# Altium PCB Kame_FMU.PcbDoc (part 2 of 2)
Units mm, origin at the board's own origin, x right, y up, seen from the top; angles counter-clockwise.
Board outline 31 x 31 mm, 6 copper layers (Top, GND2, L3, L4, GND5, Bottom), stack 1.578 mm thick; 102 components, 158 nets, 567 pads, 386 vias.
Unrouted connection lines stored in the file: 87.
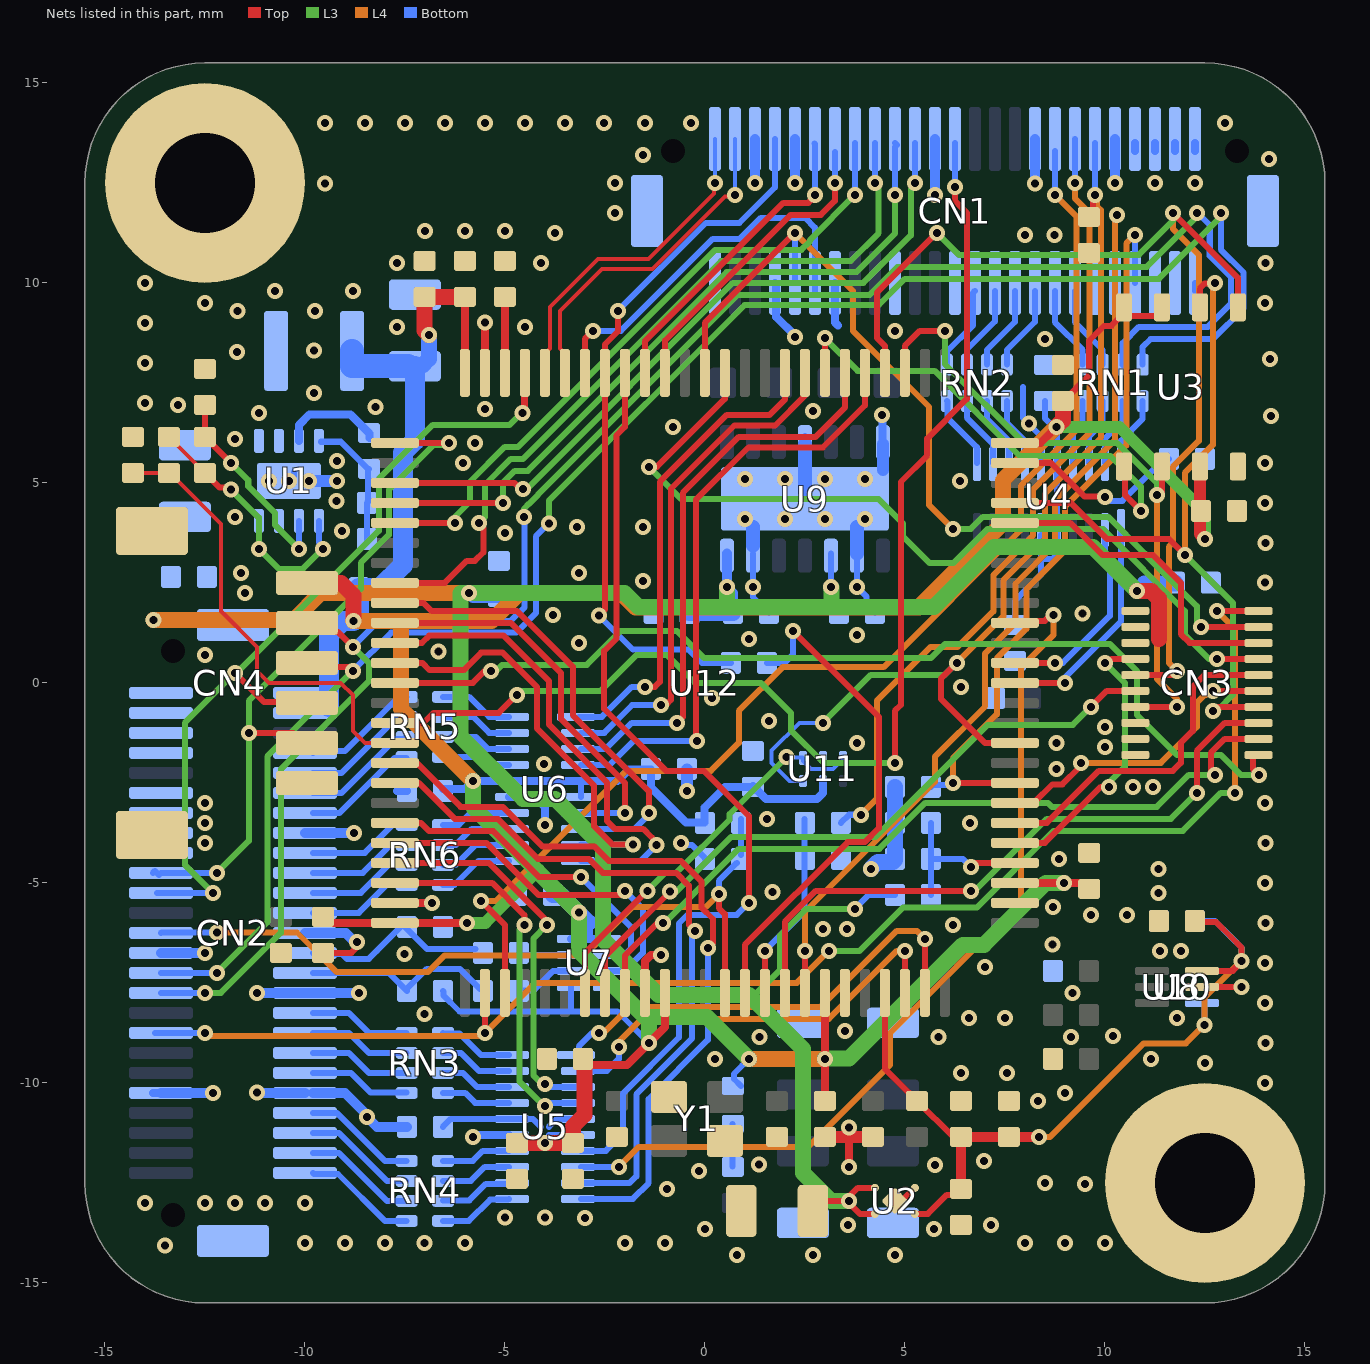
[diagram p6: the nets of this part, all layers, seen from the top]

## Via types
v1: diameter 0.4, hole 0.2, Top to Bottom, tented both sides, 375 vias
v2: diameter 0.4, hole 0.2, Top to Bottom, 11 vias

## Nets (pads, with @x,y where several pads share a name; then routed paths per layer and width w, separated by ;. In a path a pad name is that pad's centre, name@x,y a point inside that pad or via, vN(x,y) a via of type N, cw(c..) or ccw(c..) an arc to the next point about the centre after c; other vN are vias at no path point) (continued)
GND: C1.1 C2.1 C3.2 C4.1 C6.2 C7.2 C8.1 C9.1 C10.1 C11.1 C12.1 C13.1 C14.1 C15.2 C16.1 C17.1 C18.1 C19.1 C20.1 C21.1 C22.1 C23.1 C24.1 C25.1 C26.1 C27.1 C28.2 C29.2 C30.2 C31.2 C32.2 C33.2 C34.2 C35.2 C36.1 C37.2 C38.1 C39.1 C40.2 C41.2 C42.2 C43.2 C44.1 CN1.1 CN1.2 CN1.3 CN1.4 CN1.5 CN1.6 CN1.7 CN1.9 CN1.12 CN1.17 CN1.26 CN1.27 CN1.32 CN1.38 CN1.41 CN1.44 CN1.45 CN1.50 CN1.MP1 CN1.MP2 CN2.11 CN2.13 CN2.15 CN2.16 CN2.17 CN2.26 CN2.27 CN2.32 CN2.41 CN2.42 CN2.MP1 CN2.MP2 CN3.15 CN3.17 CN3.19 CN4.6 CN4.MP1 CN4.MP2 PTH1.1 PTH2.1 R3.1 R10.1 R15.1 R17.2 R22.1 R25.1 R27.1 R28.1 R29.1 R30.2 RJ1.2 U1.1 U1.9 U2.2 U2.5 U3.4 U4.15 U5.15 U6.15 U7.4 U8.5 U9.2 U9.6 U9.11 U9.14 U9.15 U10.5 U11.2 U12.10 U12.20 U12.27 U12.74 U12.99 Y1.2 Y1.4 | length 48.7
  Top w0.15: C30.2@-9.55,-6.75 -8.837,-6.75 -8.6,-6.513 v1@-8.6,-6.475 ; U12.10@-1.5,-7.75 U12.10@-1.5,-7.275 ; Y1.4@-0.9,-10.35 Y1.4@-0.616,-10.634 ; Y1.2@0.125,-11.125 0.45,-11.45 Y1.2@0.5,-11.45 ; U2.5@4.75,-12.95 4.925,-12.95 U2.2@5.25,-12.625 ; U8.5@12.485,-7.6 v1(13.41,-7.6)
  Top w0.2: U12.99@-7.75,-5.5 v1(-6.824,-5.5) ; U12.74@-5.5,7.75 -5.497,7.753 -5.497,9.013 v1(-5.494,9.016) ; U12.10@-1.5,-7.75 -1.5,-6.95 -1.35,-6.8 v1(-1.1,-6.8) ; v1(3.6,-12.1) 3.6,-11.35 v1(3.6,-11.11)
  Top w0.3: C33.2@3,-11.35 3.6,-11.35 C36.1@4.2,-11.35
  Bottom w0.15: v2(-10.4,5.05) -10.276,5.174 U1.9@-10.276,5.274 ; U1.9@-9.887,5.05 -9.875,5.062 U1.9@-9.875,5.176 ; v1(-0.6,-4) -0.552,-4.048 -0.327,-4.048 0,-4.375 C44.1@0,-4.4 ; U9.6@1.2,3.23 U9.6@1.2,3.18 v1@1.2,2.432 ; C20.1@1.6,1.75 1.201,2.149 v1@1.201,2.431 ; U9.11@2.5,5.97 U9.11@2.5,6.17 ; v1(3.8,2.4) 4.034,2.166 4.034,1.966 C19.1@4.25,1.75 ; v1@3.8,2.469 U9.2@3.8,3.23 ; 7.95,7.4 7.95,6.622 8.4,6.172 U4.15@8.4,5.5 ; CN1.2@12.25,9.8 CN1.2@12.25,10 ; U10.5@12.485,-7.6 v1(13.41,-7.6) ; v1@1.2,2.432 v1@1.201,2.431 ; v1@1.2,2.432 1.2,2.41 1.201,2.409 v1@1.201,2.431
  Bottom w0.2: CN2.41@-13.8,-10.25 CN2.41@-13.6,-10.25 ; v1(-8.775,-3.75) -8.75,-3.75 v1@-8.746,-3.746 ; v1@-8.754,-6.475 v1(-8.7,-6.475) ; v1@-8.654,-6.475 v1@-8.6,-6.475 ; C14.1@-7.7,-2.7 C14.1@-7.45,-2.7 ; v1(-5.8,-11.355) -5.746,-11.355 -5.691,-11.3 U5.15@-4.9,-11.3 ; U6.15@-4.9,-2.85 -4.259,-2.85 -4,-3.109 v1@-4,-3.45 ; CN1.44@1.75,10 1.78,9.97 1.78,9.152 2.25,8.682 v1(2.25,8.65) ; CN1.38@3.25,10 3.25,9.014 3.325,8.939 ; v1(4.433,6.7) 4.441,6.691 4.441,5.979 U9.14@4.45,5.97 ; CN1.9@10.25,13.3 CN1.9@10.25,13.5 ; CN1.7@10.75,13.3 CN1.7@10.75,13.5 ; CN1.5@11.25,13.3 CN1.5@11.25,13.5 ; CN1.3@11.75,13.3 CN1.3@11.75,13.5 ; CN1.1@12.25,13.3 CN1.1@12.25,13.5
  Bottom w0.25: CN2.41@-13.6,-10.25 v1(-12.3,-10.25) ; CN2.27@-13.6,-6.75 v1(-12.5,-6.75) ; v1(-11.2,-10.245) -11.197,-10.247 -10.003,-10.247 CN2.42@-10,-10.25 ; v1(-11.2,-7.75) CN2.32@-10,-7.75 v1(-8.654,-7.75) ; CN2.26@-10,-6.25 -8.979,-6.25 v1@-8.754,-6.475 ; CN2.16@-10,-3.75 v1(-8.775,-3.75) ; CN2.42@-9.8,-10.25 -9,-10.25 -8.45,-10.8 v1(-8.45,-10.85) -8.2,-11.1 C13.1@-7.45,-11.1 ; v1(1.25,12.5) CN1.45@1.25,13.6 ; v1(2.25,12.5) CN1.41@2.25,13.6 ; v1(5.75,12.2) CN1.27@5.75,13.6 ; v1(8.25,12.482) CN1.17@8.25,13.6 ; v1(10.25,12.5) CN1.9@10.25,13.6
  Bottom w0.3: U1.9@-9.887,5.05 v1(-9.2,5.05) ; v1@-0.467,-2.667 -0.463,-2.667 -0.45,-2.654 C15.2@-0.45,-2.167 ; U9.15@4.45,5.32 U9.14@4.45,5.97
  Bottom w0.35: U9.6@1.2,3.43 U9.15@1.2,3.899 ; U9.15@2.5,4.8 U9.11@2.5,5.97 ; U9.2@3.8,3.23 U9.15@3.8,3.9
  Bottom w0.4: v1(4.15,-4.65) 4.325,-4.475 4.7,-4.475 4.75,-4.425 R22.1@4.75,-4.4 C39.1@4.75,-3.5 R30.2@4.75,-2.6
  other v1: 0.8,-14.3 2.7,-14.3 4.75,-14.3 -13.5,-14.062 -10,-14 -9,-14 -8,-14 -7.006,-14 -6,-14 -2,-14 -1,-14 8,-14 9,-14 10,-14 0,-13.65 5.728,-13.65 3.576,-13.55 7.15,-13.55 -3,-13.375 -5,-13.363 -4,-13.363 -14,-13.005 -12.494,-13.005 -11.75,-13.005 -11,-13.005 -10,-13.005 -0.95,-12.65 9.5,-12.525 8.5,-12.5 -0.15,-12.2 1.347,-12.034 5.75,-12.05 6.976,-11.95 8.332,-10.45 9,-10.25 14,-10 6.4,-9.75 7.55,-9.75 12.5,-9.5 0.248,-9.4 11.15,-9.4 14.01,-9 1.36,-8.849 5.834,-8.849 9.15,-8.849 10.2,-8.828 3.5,-8.7 6.602,-8.379 7.5,-8.379 11.8,-8.379 -7.006,-8.275 14,-8 9.195,-7.75 7.002,-7.1 14,-7 -7.508,-6.779 11.375,-6.698 11.905,-6.7 8.695,-6.541 2.95,-6.15 3.55,-6.15 6.2,-6.049 14.01,-6 9.65,-5.8 10.55,-5.8 8.7,-5.6 11.338,-5.25 1.688,-5.232 14,-5 11.338,-4.65 8.85,-4.4 -12.5,-4 14.01,-4 -4,-3.55 -12.5,-3.5 6.633,-3.5 1.55,-3.4 -12.5,-3 14,-3 -0.45,-2.7 10.7,-2.6 11.2,-2.6 8.785,-2.156 -4.017,-2.028 10,-1.6 3.8,-1.5 8.785,-1.5 10,-1.1 1.6,-0.95 0.18,-0.383 6.4,-0.1 -12.494,0.7 -6.66,0.784 -3.15,1 1.1,1.095 3.8,1.2 -3.8,1.7 9.445,1.734 -11.5,2.25 1.2,2.4 14,2.505 -1.55,2.55 -11.6,2.75 -3.15,2.75 14.01,3.5 -5,3.742 -9.071,3.798 -3.2,3.9 -1.55,3.9 -11.75,4.15 14,4.5 -9.211,4.55 6.372,5.049 -6.05,5.502 14,5.5 -9.2,5.55 -5.748,6 -11.75,6.1 -0.8,6.4 8.107,6.488 14.15,6.677 -11.15,6.75 2.7,6.8 -5.501,6.85 -8.238,6.897 -13.176,6.95 -14,7 -9.773,7.25 -14,8 14.133,8.1 -11.7,8.268 -9.773,8.305 8.5,8.6 4.75,8.8 -7.7,8.9 -4.5,8.9 -14,9 -11.683,9.3 -9.746,9.3 -12.5,9.5 14,9.5 -10.75,9.8 -8.8,9.8 -14,10 -7.7,10.5 -4.1,10.5 14.01,10.5 8,11.2 8.744,11.2 -3.746,11.25 -7,11.3 -6,11.3 -5,11.3 -2.25,11.75 -9.5,12.482 -2.25,12.5 11.25,12.5 12.25,12.5 14.1,13.1 -1.55,13.2 -9.5,14 -8.5,14 -7.5,14 -6.5,14 -5.494,14 -4.5,14 -3.5,14 -2.517,14 -1.5,14 -0.35,14 13,14
  other v2: 1,4.1 2,4.1 3,4.1 4,4.1 -10.9,5.05 -9.9,5.05 1,5.1 2,5.1 3,5.1 4,5.1
GPIO1: CN1.25 U12.90 | length 31
  Top w0.15: U12.90@-7.75,-1 -7.034,-1 -6.784,-0.75 -5.15,-0.75 v1(-4.7,-0.3) ; v1(4.75,-2) 4.75,-0.7 4.898,-0.552 4.898,5.024 5.556,5.681 5.556,6.106 6.55,7.1 6.55,11.75 6.25,12.05
  Top w0.152: 6.25,12.05 v1(6.25,12.4)
  L3 w0.15: v1(-4.7,-0.3) -4.6,-0.2 -2.6,-0.2 -1.7,0.7 -0.95,0.7 -0.25,0 1.4,0 2.15,-0.75 2.15,-1.184 2.966,-2 v1(4.75,-2)
  Bottom w0.15: v1(4.75,-2) v1@4.8,-1.95
  Bottom w0.152: v1(6.25,12.4) 6.25,12.5 CN1.25@6.25,13.5
GPIO2: CN1.40 U12.69 | length 9.5
  Top w0.15: U12.69@-3,7.75 -3,8.6 v1(-2.8,8.8)
  Bottom w0.15: v1(-2.8,8.8) -2.104,8.8 0.196,11.1 0.876,11.1 1.401,11.625 2.505,11.625 2.75,11.38 CN1.40@2.75,10 CN1.40@2.75,9.8
I2C_SCL: U7.2 U12.95 | length 8.2
  Top w0.15: U12.95@-7.75,-3.5 -7.1,-3.5 -6.9,-3.7 -5.3,-3.7 -4.15,-4.85 v1(-3.1,-4.85)
  Bottom w0.15: v1(-3.1,-4.85) -1.85,-6.1 -1.85,-6.65 -2,-6.8 U7.2@-2.45,-6.8
I2C_SCL_MB: CN2.28 R5.2 R7.2 | length 4.8
  Bottom w0.15: CN2.28@-9.8,-6.75 -9.771,-6.779 -9.071,-6.779 -8.95,-6.9 -8.402,-6.9 -8.202,-6.7 -7.551,-6.049 R5.2@-7.45,-6.15 ; R5.2@-7.45,-6.1 R5.2@-7.45,-6.15 ; R7.2@-5.73,-6.65 -6.95,-6.65 R5.2@-7.45,-6.15
I2C_SDA: U7.3 U12.96 | length 9.2
  Top w0.15: U12.96@-7.75,-4 -5.463,-4 -4.163,-5.3 -2.1,-5.3 v1(-2,-5.2)
  Bottom w0.15: U7.3@-2.45,-7.2 -2,-7.2 -1.55,-6.75 -1.55,-5.65 v1(-2,-5.2)
I2C_SDA_MB: CN2.30 R6.1 R8.2 | length 4.9
  Bottom w0.15: CN2.30@-9.8,-7.25 -7.9,-7.25 -7.45,-7.7 -7.45,-7.65 -6.95,-7.15 -6.125,-7.15 -5.625,-7.65 R8.2@-5.555,-7.65
ICM_INT#: CN3.11 U12.8 | length 17.1
  Top w0.15: U12.8@-2.5,-7.75 -2.5,-6.842 v1(-0.874,-5.216) ; v1(9.65,-0.6) 10.05,-0.2 CN3.11@10.98,-0.2
  L3 w0.15: v1(-0.874,-5.216) -0.712,-5.216 0.654,-3.85 4.267,-3.85 7.067,-1.05 9.2,-1.05 v1(9.65,-0.6)
IMU_HEAT_CTL: CN1.42 CN3.4 U12.63 | length 23.7
  Top w0.15: U12.63@0,7.75 0,9 v1(2.25,11.25) ; v1@12.3,1.4 v1(12.4,1.4) CN3.4@13.62,1.4
  L3 w0.15: v1(6.2,3.85) 6.65,3.85 6.95,4.15 10.084,4.15 11,3.234 11,3.222 12.3,1.922 v1@12.3,1.4
  L4 w0.15: v1(2.25,11.25) 3.7,9.8 3.7,8.804 5.607,6.897 5.607,4.443 v1(6.2,3.85)
  Bottom w0.15: CN1.42@2.25,10 2.25,10.008 v1(2.25,11.25)
MB_ESC_M1: CN1.14 RN1.6 | length 2.1
  Bottom w0.15: CN1.14@9.25,9.8 9.25,9.018 9.945,8.323 RN1.6@9.945,7.955
MB_ESC_M2: CN1.16 RN1.5 | length 2.1
  Bottom w0.15: CN1.16@8.75,9.8 8.75,9.02 9.445,8.325 RN1.5@9.445,7.955
MB_ESC_M3: CN1.18 RN2.8 | length 2.1
  Bottom w0.15: RN2.8@7.55,7.955 7.55,8.322 8.25,9.022 CN1.18@8.25,9.8
MB_ESC_M4: CN1.20 RN2.7 | length 2.1
  Bottom w0.15: RN2.7@7.05,7.955 7.05,8.322 7.75,9.022 CN1.20@7.75,9.8
MB_ESC_M5: CN1.22 RN2.6 | length 2.1
  Bottom w0.15: RN2.6@6.55,7.955 6.55,8.336 7.25,9.036 CN1.22@7.25,9.8
MB_ESC_M6: CN1.24 RN2.5 | length 2.1
  Bottom w0.15: RN2.5@6.05,7.955 6.05,8.285 6.696,8.931 6.696,9.746 CN1.24@6.75,9.8
MPU_INT#: CN3.8 U12.62 | length 21.5
  Top w0.15: v1(-1.4,5.4) -1.4,5.3 -1.3,5.4 -1.2,5.4 0.5,7.1 U12.62@0.5,7.6 ; v1(12.8,0.6) CN3.8@13.62,0.6
  L3 w0.15: v1(-1.4,5.4) -0.594,4.594 4.341,4.594 4.946,3.989 4.946,3.663 5.61,3 6.22,3 7.07,3.85 9.948,3.85 12,1.798 12,1.2 12.6,0.6 v1(12.8,0.6)
NetD1_1: D1.1 R18.2 | length 1.1
  Bottom w0.15: R18.2@0.692,-12.095 D1.1@0.692,-11.025
NetR1_2: R1.2 R3.2 U1.6 | length 5.4
  Top w0.152: R1.2@-12.605,6.155 -12.503,6.155 R1.2@-12.5,6.152 ; R1.2@-12.5,6.15 R1.2@-12.5,6.152 ; R3.2@-12.5,6.95 R1.2@-12.5,6.152 ; v1(-11.85,5.502) R1.2@-12.5,6.152
  L3 w0.152: v1(-11.85,5.502) -11.417,5.069 -11.417,4.917 -10.75,4.25 -10.75,3.95 v1(-10.15,3.35)
  Bottom w0.152: v1(-10.15,3.35) -10.15,4.047 -10.152,4.048 U1.6@-10.15,4.05
NetR7_1: R7.1 U7.7 | length 1.3
  Bottom w0.15: R7.1@-4.65,-6.75 -4.6,-6.8 U7.7@-3.35,-6.8
NetR8_1: R8.1 U7.6 | length 1.5
  Bottom w0.15: R8.1@-4.645,-7.695 -4.289,-7.695 -3.794,-7.2 U7.6@-3.35,-7.2
NetRN1_1: RN1.1 U4.20 | length 1.4
  Bottom w0.15: U4.20@10.4,5.5 U4.20@10.417,5.517 ; 10.4,5.9 10.404,5.904 10.404,6.059 10.945,6.6 RN1.1@10.945,7.045
NetRN1_2: RN1.2 U4.19 | length 1.7
  Bottom w0.15: U4.19@10,5.5 10,6.1 10.445,6.545 RN1.2@10.445,7.045
NetRN1_3: RN1.3 U4.18 | length 1.7
  Bottom w0.15: U4.18@9.6,5.5 9.6,6.15 9.945,6.495 RN1.3@9.945,7.045
NetRN1_4: RN1.4 U4.17 | length 1.6
  Bottom w0.15: U4.17@9.2,5.5 9.2,6.25 9.445,6.495 RN1.4@9.445,7.045
NetRN2_1: RN2.1 U4.14 | length 1.7
  Bottom w0.15: RN2.1@7.55,7.045 7.55,6.5 8,6.05 U4.14@8,5.5
NetRN2_2: RN2.2 U4.13 | length 1.8
  Bottom w0.15: RN2.2@7.05,7.045 7.05,6.6 7.6,6.05 U4.13@7.6,5.5
NetRN2_3: RN2.3 U4.12 | length 1.8
  Bottom w0.15: RN2.3@6.55,7.045 6.55,6.631 7.2,5.981 U4.12@7.2,5.5
NetRN2_4: RN2.4 U4.11 | length 1.9
  Bottom w0.15: RN2.4@6.05,7.045 6.06,7.035 6.06,6.633 6.8,5.893 U4.11@6.8,5.5
NetRN3_1: RN3.1 U5.20 | length 1.9
  Bottom w0.15: RN3.1@-6.545,-8.75 -6.528,-8.767 -6.133,-8.767 -5.6,-9.3 U5.20@-4.9,-9.3
NetRN3_2: RN3.2 U5.19 | length 1.8
  Bottom w0.15: RN3.2@-6.545,-9.25 -6.1,-9.25 -5.65,-9.7 U5.19@-4.9,-9.7
NetRN3_3: RN3.3 U5.18 | length 1.8
  Bottom w0.15: RN3.3@-6.545,-9.75 -6.05,-9.75 -5.7,-10.1 U5.18@-4.9,-10.1
NetRN3_4: RN3.4 U5.17 | length 1.7
  Bottom w0.15: RN3.4@-6.545,-10.25 -5.995,-10.25 -5.745,-10.5 U5.17@-4.9,-10.5
NetRN4_1: RN4.1 U5.14 | length 1.7
  Bottom w0.15: RN4.1@-6.545,-11.95 -5.8,-11.95 -5.55,-11.7 U5.14@-4.9,-11.7
NetRN4_2: RN4.2 U5.13 | length 1.8
  Bottom w0.15: RN4.2@-6.545,-12.45 -5.85,-12.45 -5.5,-12.1 U5.13@-4.9,-12.1
NetRN4_3: RN4.3 U5.12 | length 1.8
  Bottom w0.15: RN4.3@-6.545,-12.938 -5.888,-12.938 -5.475,-12.525 -4.925,-12.525 U5.12@-4.9,-12.5
NetRN4_4: RN4.4 U5.11 | length 1.9
  Bottom w0.15: RN4.4@-6.545,-13.45 -5.9,-13.45 -5.369,-12.919 -4.919,-12.919 U5.11@-4.9,-12.9
NetRN5_1: RN5.1 U6.20 | length 1.9
  Bottom w0.15: RN5.1@-6.545,-0.35 -5.892,-0.35 -5.392,-0.85 U6.20@-4.9,-0.85
NetRN5_2: RN5.2 U6.19 | length 1.8
  Bottom w0.15: RN5.2@-6.528,-0.85 -5.795,-0.85 -5.395,-1.25 U6.19@-4.9,-1.25
NetRN5_3: RN5.3 U6.18 | length 1.6
  Bottom w0.15: RN5.3@-6.345,-1.35 -5.725,-1.35 -5.425,-1.65 U6.18@-4.9,-1.65
NetRN5_4: RN5.4 U6.17 | length 1.7
  Bottom w0.15: RN5.4@-6.545,-1.85 -5.679,-1.85 -5.479,-2.05 U6.17@-4.9,-2.05
NetRN6_1: RN6.1 U6.14 | length 1.8
  Bottom w0.15: RN6.1@-6.545,-3.55 -6.152,-3.55 -5.852,-3.25 U6.14@-4.9,-3.25
NetRN6_2: RN6.2 U6.13 | length 1.8
  Bottom w0.15: RN6.2@-6.545,-4.05 -6.225,-4.05 -5.825,-3.65 U6.13@-4.9,-3.65
NetRN6_3: RN6.3 U6.12 | length 1.9
  Bottom w0.15: RN6.3@-6.545,-4.55 -6.233,-4.55 -5.733,-4.05 U6.12@-4.9,-4.05
NetRN6_4: RN6.4 U6.11 | length 1.9
  Bottom w0.15: RN6.4@-6.545,-5.05 -6.26,-5.05 -5.66,-4.45 U6.11@-4.9,-4.45
RC_INPUT: CN1.11 R17.1 U11.6 U12.35 | length 25.3
  Top w0.15: v1(6.3,0.5) 5.9,0.1 5.9,-0.4 7,-1.5 U12.35@7.75,-1.5 ; R17.1@9.6,11.65 9.702,11.752 9.702,12.152 v1(9.75,12.2)
  L3 w0.15: v1(2.95,-1) 4.15,0.2 6,0.2 v1(6.3,0.5)
  L4 w0.15: v1(6.3,0.5) 7.462,1.662 7.462,2.562 8.497,3.597 8.497,4.726 9.901,6.13 9.901,11.817 9.798,11.921 9.798,12.152 v1(9.75,12.2)
  Bottom w0.1: U11.6@2.45,-2.45 2.114,-2.45 1.67,-2.005 1.67,-1.695 2.364,-1 v1(2.95,-1)
  Bottom w0.15: v1@9.75,12.25 CN1.11@9.75,13.5
RC_PWR3_ON#: CN1.15 U12.3 | length 30.6
  Top w0.15: v1(-5.6,-5.45) -5,-6.05 U12.3@-5,-7.75
  L4 w0.15: v1(-5.6,-5.45) -5.213,-5.45 -1.963,-2.2 0.148,-2.2 0.85,-1.498 0.85,-0.7 1.942,0.392 4.47,0.392 7.9,3.823 7.9,4.934 9.293,6.327 9.293,11.657 v1(8.75,12.2)
  Bottom w0.15: v1(8.75,12.2) 8.75,12.25 CN1.15@8.75,13.3
RSSI_IN: CN1.13 R26.2 | length 20.5
  L4 w0.152: v1(3.9,-3.3) 4.3,-2.9 4.3,-0.44 5.64,0.9 6.319,0.9 7.211,1.791 7.211,2.694 8.2,3.684 8.2,4.833 9.613,6.246 9.613,11.75 9.25,12.113 9.25,12.45 v1@9.2,12.4
  Bottom w0.152: R26.2@3.4,-3.5 3.604,-3.296 3.9,-3.296 v1@3.848,-3.347 ; v1(9.25,12.5) CN1.13@9.25,13.6
RSSI_IN_R: R26.1 R27.2 U12.16 | length 4.8
  Top w0.15: U12.16@1.5,-7.75 v1(1.5,-6.7)
  Bottom w0.15: v1(1.5,-6.7) 2.495,-5.705 2.495,-4.5 2.495,-4.1 R26.1@2.495,-3.4
RST#: C44.2 CN2.25 R19.1 U12.14 | length 19.6
  Top w0.15: v1(0.35,-5.278) 0.35,-5.633 0.5,-5.783 U12.14@0.5,-7.75
  L4 w0.15: v1(-12.195,-6.24) -10.197,-6.24 -9.207,-7.229 -6.928,-7.229 -6.516,-6.817 -3.017,-6.817 -1.8,-5.6 0.028,-5.6 v1(0.35,-5.278)
  Bottom w0.15: CN2.25@-13.6,-6.25 -13.59,-6.24 v1(-12.195,-6.24) ; v1(0.35,-5.278) 0.35,-4.95 C44.2@0.8,-4.5 ; C44.2@0.9,-4.3 R19.1@0.9,-3.5 R19.1@0.9,-3.4
S_AGND: R4.1 RJ1.1 U1.3 | length 2.6
  Bottom w0.2: U1.3@-10.15,6.05 -10.15,6.45 -9.892,6.708 -8.858,6.708 -8.383,6.233 R4.1@-8.383,6.119
SBUS_INV: U11.1 U11.3 U12.7 | length 9.9
  Top w0.15: U12.7@-3,-7.75 -3,-6.763 v1(-1.437,-5.2)
  L3 w0.15: v1(-1.437,-5.2) -0.987,-4.75 -0.713,-4.75 0.614,-3.423 0.614,-3.281 2.002,-1.893 v1@2.087,-1.893
  Bottom w0.1: v1(2.045,-1.85) 2.057,-1.863 2.438,-1.863 U11.1@2.45,-1.875 2.45,-1.95 2.65,-2.15 3.2,-2.15 3.45,-1.9 U11.3@3.45,-1.85
SDIO_CLK: CN1.35 U12.80 | length 16.5
  Top w0.15: U12.80@-7.75,4 v1@-6.4,4
  L3 w0.15: v1@-6.4,4 -6.378,4.022 -5.874,4.526 -5.874,5.026 -5,5.9 -4.669,5.9 0.256,10.825 2.409,10.825 2.629,11.045 2.629,11.079 v1(3.75,12.2)
  Bottom w0.15: v1(3.75,12.2) CN1.35@3.75,13.5
  other v1: -6.25,4
SDIO_CMD: CN1.33 U12.83 | length 19.1
  Top w0.15: U12.83@-7.75,2.5 -6.5,2.5 -5.95,3.05 -5.75,3.05 -5.536,3.264 -5.536,3.873 -5.65,3.987 v1(-5.65,4)
  L3 w0.15: v1(-5.65,4) -5.501,4.149 -5.501,4.949 -4.85,5.6 -4.543,5.6 0.405,10.548 3.648,10.548 4.342,11.242 4.342,12.358 v1@4.25,12.45
  Bottom w0.15: v1@4.25,12.45 v1(4.25,12.5) CN1.33@4.25,13.5
SDIO_D0: CN1.37 U12.65 | length 7.7
  Top w0.15: U12.65@-1,7.75 -0.998,7.752 -0.998,8.556 2.145,11.7 2.9,11.7 3.25,12.05 v1@3.25,12.45
  Bottom w0.15: v1@3.25,12.45 CN1.37@3.25,13.277
  other v1: 3.25,12.5
SDIO_D1: CN1.39 U12.66 | length 7.9
  Top w0.15: v1(2.75,12.2) 2.75,12.163 2.587,12 1.963,12 -1.5,8.537 U12.66@-1.5,7.776 ; U12.66@-1.5,7.776 -1.513,7.763 U12.66@-1.5,7.75 U12.66@-1.5,7.776
  Bottom w0.15: CN1.39@2.737,13.487 2.75,13.474 v1(2.75,12.2)
SDIO_D2: CN1.29 U12.78 | length 17.9
  Top w0.15: U12.78@-7.75,5 -4.763,5 -4.613,4.85 v1(-4.55,4.85)
  L3 w0.15: v1(-4.55,4.85) -4.508,4.892 -4.408,4.892 0.7,10 3.961,10 5.15,11.189 5.15,12.35 v1@5.25,12.45
  Bottom w0.15: v1@5.25,12.45 v1(5.25,12.5) CN1.29@5.25,13.5
SDIO_D3: CN1.31 U12.79 | length 17.9
  Top w0.15: U12.79@-7.75,4.5 v1(-5.05,4.5)
  L3 w0.15: v1(-5.05,4.5) -5.05,5 -4.75,5.3 -4.428,5.3 0.54,10.269 3.786,10.269 4.75,11.233 v1(4.75,12.2)
  Bottom w0.15: v1(4.75,12.2) 4.75,13.4 4.8,13.45 CN1.31@4.75,13.5
SPI1_CLK: CN3.7 U12.30 | length 7.2
  Top w0.15: U12.30@7.75,-4 8.5,-4 9.9,-2.6 v1(10.1,-2.6) ; v1(10,0.5) 10.068,0.5 10.168,0.6 CN3.7@10.76,0.6
  L3 w0.15: v1(10,0.5) 10.5,0 10.5,-2.1 10.1,-2.5 v1(10.1,-2.6)
SPI1_CS_ICM#: CN3.18 U12.9 | length 19.4
  Top w0.15: U12.9@-2,-7.75 -2,-6.82 -1.18,-6.001 v1@-1.001,-6.001 ; v1(12.75,-2.3) 12.65,-2.2 12.65,-1.75 13,-1.4 CN3.18@13.62,-1.4
  L3 w0.15: v1@-1.026,-6.024 0.848,-4.15 4.36,-4.15 5.51,-3 8.575,-3 8.675,-3.1 11.297,-3.1 12.097,-2.3 v1(12.75,-2.3)
  other v1: -1.05,-6
SPI1_CS_LIS3#: CN3.6 U12.46 | length 7.9
  Top w0.15: U12.46@7.75,4 9.135,4 9.935,3.2 11.2,3.2 11.9,2.5 11.9,1.218 12.118,1 CN3.6@13.62,1
SPI1_CS_MPU#: CN3.16 U12.17 | length 16.1
  Top w0.15: U12.17@2,-7.75 2,-5.975 2.775,-5.2 v1(6.65,-5.2) ; v1(12.3,-2.75) 12.3,-1.7 13,-1 CN3.16@13.62,-1
  L3 w0.15: v1(6.65,-5.2) 6.75,-5.2 8.55,-3.4 11.65,-3.4 v1(12.3,-2.75)
SPI1_MISO: CN3.10 U12.31 | length 8.4
  Top w0.15: U12.31@7.75,-3.5 8.55,-3.5 9.85,-2.2 11.7,-2.2 11.9,-2 11.9,-1.5 12.2,-1.2 12.2,-0.1 12.5,0.2 CN3.10@13.7,0.2
SPI1_MOSI: CN3.12 U12.32 | length 7.6
  Top w0.15: U12.32@7.75,-3 8.225,-3 8.691,-2.534 8.937,-2.534 9.352,-2.119 9.352,-2.048 v1(9.4,-2) ; v1(12.7,-0.2) CN3.12@13.84,-0.2
  L4 w0.15: v1(9.4,-2) 11.4,-2 12.3,-1.1 12.3,-0.5 12.499,-0.301 12.532,-0.301 12.632,-0.2 v1(12.7,-0.2)
SPI2_CLK: CN3.14 U3.6 U12.47 | length 18.3
  Top w0.15: U12.47@7.75,4.5 9.15,4.5 10.05,3.6 11.6,3.6 v1(12,3.2) ; U3.6@12.375,9.39 12.375,9.866 12.494,9.985 v1@12.585,9.985 ; v1(12.7,-0.7) 12.725,-0.7 12.825,-0.6 CN3.14@13.84,-0.6
  L3 w0.15: v1(12,3.2) 13.2,2 13.2,-0.3 v1@12.848,-0.652
  L4 w0.15: v1(12,3.2) 12,5.25 12.7,5.95 12.7,9.95 v1(12.75,10)
SPI2_CS_FRAM#: U3.1 U12.57 | length 12.1
  Top w0.15: U12.57@3,7.75 v1(3,8.618) ; U3.1@10.475,5.41 10.475,5.125 10.5,5.1 10.5,4.7 v1(10.9,4.3)
  L3 w0.15: v1(3,8.618) 3.818,7.8 5.743,7.8 7.872,5.672 10.135,5.672 10.9,4.907 v1@10.9,4.4
SPI2_CS_LPS25#: CN3.20 U12.88 | length 25.2
  Top w0.15: U12.88@-7.75,0 -5.8,0 -5.5,0.3 v1(-5.35,0.3) ; CN3.20@13.62,-1.8 13.7,-1.88 13.7,-2.156 v1(13.85,-2.306)
  L3 w0.15: v1(-5.35,0.3) -5.217,0.3 -5.067,0.45 -2.95,0.45 -2.1,1.3 -0.7,1.3 -0.017,0.617 5.649,0.617 6.007,0.975 10.125,0.975 10.8,0.3 10.8,-0.8 11.8,-1.8 12.9,-1.8 13.406,-2.306 v1(13.85,-2.306)
SPI2_MISO: CN3.13 U3.2 U12.53 | length 16.9
  Top w0.15: U12.53@5,7.75 5,8.425 5.375,8.8 v1(6,8.8) ; CN3.13@10.76,-0.6 v1@11.9,-0.6 ; v1(11.3,4.7) 11.377,4.777 11.425,4.777 U3.2@11.425,5.41
  L3 w0.15: v1(6,8.8) 6,7.972 7.972,6 10.3,6 11.3,5 v1(11.3,4.7)
  L4 w0.15: v1(11.3,4.7) 11.3,0.1 11.8,-0.4 v1(11.8,-0.6)
SPI2_MOSI: CN3.9 U3.5 U12.54 | length 27
  Top w0.15: U12.54@4.5,7.75 4.5,8.425 4.3,8.625 4.3,9.75 v1(5.8,11.25) ; CN3.9@10.76,0.2 v1@11.775,0.2 ; v1(11.7,11.75) 13.325,10.125 U3.5@13.325,9.39
  L3 w0.15: v1(5.8,11.25) 6.35,10.7 10.85,10.7 v1@11.8,11.65
  L4 w0.15: v1@11.7,11.65 11.7,11.35 12.35,10.7 12.35,6.05 11.7,5.4 11.7,3.5 11.6,3.4 11.6,0.5 v1(11.8,0.3) v1@11.8,0.2
SPWR_ON: CN2.35 CN3.2 U12.2 | length 36.3
  Top w0.15: U12.2@-5.5,-7.75 -5.5,-8.744 v1(-5.494,-8.75) ; v1@12.7,1.8 v1(12.8,1.8) CN3.2@13.62,1.8
  L3 w0.15: v1(3.1,-6.698) 3.869,-6.698 4.95,-5.617 6.798,-5.617 8.715,-3.7 11.95,-3.7 12.9,-2.75 v1(13.25,-2.75)
  L4 w0.15: v1(-12.5,-8.75) -12.421,-8.828 -5.573,-8.828 v1(-5.494,-8.75) -4.244,-7.5 2.298,-7.5 v1(3.1,-6.698) ; v1@12.7,1.8 v1(12.8,1.8) 13.25,1.35 v1(13.25,-2.75)
  Bottom w0.15: CN2.35@-13.745,-8.75 v1(-12.5,-8.75)
SS_LED: CN1.10 U12.18 | length 24.2
  Top w0.15: U12.18@2.495,-7.745 U12.18@2.5,-7.75 ; U12.18@2.5,-7.54 v1(2.5,-6.698)
  L4 w0.15: v1(2.5,-6.698) 2.5,-5.726 5.75,-2.476 5.75,-1.844 7.006,-0.588 7.006,0.739 7.767,1.5 7.767,2.485 8.747,3.465 8.747,4.565 10.25,6.067 10.25,11.65 v1(10.3,11.7)
  Bottom w0.15: CN1.10@10.25,10 10.25,11.65 v1(10.3,11.7)
SS_SW: CN1.8 R30.1 U12.33 | length 18.9
  Top w0.152: v1(6.2,-2.5) U12.33@7.75,-2.5
  L4 w0.152: v1(6.2,-2.5) 6.2,-1.886 7.3,-0.786 7.3,0.611 8.037,1.349 8.037,2.343 8.999,3.304 8.999,4.4 10.537,5.939 10.537,10.987 v1(10.75,11.2)
  Bottom w0.15: R30.1@5.65,-2.6 5.703,-2.547 6.153,-2.547 v1(6.2,-2.5)
  Bottom w0.152: CN1.8@10.75,10 v1(10.75,11.2)
SWDCLK: CN2.19 CN4.5 U12.76 | length 17.8
  Top w0.15: v1@-11.4,-1.252 -10.298,-1.252 CN4.5@-10.05,-1.5 ; U12.76@-7.75,6 v1(-6.4,6)
  L3 w0.15: v1(-12.2,-4.75) -11.4,-3.95 v1(-11.4,-1.25) -11.4,-0.45 -8.6,2.35 -8.6,3 -7.9,3.7 -7.9,4.83 -6.778,5.952 -6.448,5.952 v1(-6.4,6)
  Bottom w0.15: CN2.19@-13.8,-4.75 -13.75,-4.7 -13.65,-4.8 CN2.19@-13.6,-4.75 v1(-12.2,-4.75)
SWDIO: CN2.21 CN4.4 U12.72 | length 22.3
  Top w0.15: v1(-11.75,0.25) -11.017,-0.483 -10.067,-0.483 CN4.4@-10.05,-0.5 ; v1@-4.524,6.925 -4.524,7.726 U12.72@-4.5,7.75 -4.5,6.716 v1@-4.516,6.7
  L3 w0.15: v1(-12.3,-5.25) -13,-4.55 -13,-1 v1(-11.75,0.25) -11.704,0.25 -8.15,3.804 -8.15,5.1 -6.8,6.45 -4.88,6.45 -4.63,6.7 v1@-4.516,6.7
  Bottom w0.15: CN2.21@-13.7,-5.25 v1(-12.3,-5.25)
  other v1: -4.566,6.75
UART1_CTS: U5.8 U12.41 | length 22.8
  Top w0.15: U12.41@7.75,1.5 7.8,1.55 8.5,1.55 8.65,1.7 v1(8.717,1.7)
  L4 w0.15: v1(-2.15,-12.1) -1.65,-11.6 2.579,-11.6 4.633,-9.546 4.633,-8.751 7.9,-5.484 7.9,0.384 8.717,1.201 v1(8.717,1.7)
  Bottom w0.15: U5.8@-3.1,-12.1 v1(-2.15,-12.1)
UART1_CTS_MB: CN2.46 RN4.7 | length 2.8
  Bottom w0.15: CN2.46@-9.8,-11.25 -9.15,-11.25 -7.95,-12.45 RN4.7@-7.472,-12.45
UART1_RTS: U5.7 U12.67 | length 24.5
  Top w0.15: U12.67@-2,7.75 -2,6.4 -2.212,6.188 -2.212,1.105 -2.517,0.799 -2.517,-0.651 -0.968,-2.2 -0.026,-2.2 1.1,-3.326 v1(1.1,-5.5)
  Bottom w0.15: U5.7@-3.1,-11.7 -2.478,-11.7 -2.045,-11.267 -2.045,-10.26 -0.65,-8.865 -0.65,-6.014 -0.436,-5.8 0.8,-5.8 v1(1.1,-5.5)
UART1_RTS_MB: CN2.44 RN4.8 | length 2.8
  Bottom w0.15: CN2.44@-9.8,-10.75 -9.2,-10.75 -8,-11.95 RN4.8@-7.455,-11.95
UART1_RX: U5.9 U12.93 | length 17.8
  Top w0.15: U12.93@-7.75,-2.5 -7.151,-2.5 -6.251,-3.4 -5.179,-3.4 -4.179,-4.4 -2.9,-4.4 -2.55,-4.75 -0.716,-4.75 -0.4,-5.066 -0.4,-6.05 v1(-0.25,-6.2)
  Bottom w0.15: U5.9@-3.1,-12.5 -1.882,-12.5 -1.716,-12.334 -1.716,-10.284 -0.325,-8.893 -0.325,-6.275 v1(-0.25,-6.2)
UART1_RX_MB: CN2.48 RN4.6 | length 2.8
  Bottom w0.15: CN2.48@-9.8,-11.75 -9.15,-11.75 -7.95,-12.95 RN4.6@-7.455,-12.95
UART1_TX: U5.10 U12.92 | length 19
  Top w0.15: U12.92@-7.75,-2 -7.206,-2 -6.106,-3.1 -5.05,-3.1 -4.058,-4.092 -2.758,-4.092 -2.4,-4.45 -0.6,-4.45 -0.084,-4.966 -0.084,-5.616 0.201,-5.901 0.201,-6.498 v1(0.075,-6.625)
  Bottom w0.15: U5.10@-3.1,-12.9 -1.8,-12.9 -1.407,-12.507 -1.407,-10.407 0.075,-8.925 v1@0.075,-6.66
UART1_TX_MB: CN2.50 RN4.5 | length 2.8
  Bottom w0.15: CN2.50@-9.8,-12.25 -9.773,-12.277 -9.173,-12.277 -8,-13.45 RN4.5@-7.455,-13.45
UART2_CTS: U6.8 U12.84 | length 11.5
  Top w0.15: U12.84@-7.75,2 -7.037,2 -6.837,1.8 -4.7,1.8 -3.3,0.4 -3.3,-0.803 -1.4,-2.703 v1(-1.4,-3.25)
  Bottom w0.15: U6.8@-3.1,-3.65 -1.75,-3.65 -1.35,-3.25 v1(-1.4,-3.25)
UART2_CTS_MB: CN2.20 RN6.7 | length 2.6
  Bottom w0.15: CN2.20@-9.8,-4.75 -8.55,-4.75 -7.85,-4.05 RN6.7@-7.455,-4.05
UART2_RTS: U6.7 U12.85 | length 9.9
  Top w0.15: U12.85@-7.75,1.5 -4.85,1.5 -3.6,0.25 -3.6,-0.9 -2,-2.5 v1(-2,-3.25)
  Bottom w0.15: U6.7@-3.1,-3.25 v1(-2,-3.25)
UART2_RTS_MB: CN2.18 RN6.8 | length 2.6
  Bottom w0.15: CN2.18@-9.8,-4.25 -8.5,-4.25 -7.8,-3.55 RN6.8@-7.455,-3.55
UART2_RX: U6.9 U12.87 | length 10.5
  Top w0.15: U12.87@-7.75,0.5 -7.066,0.5 -6.886,0.32 -6.03,0.32 -5.593,0.757 -5.057,0.757 -4.2,-0.1 -4.2,-1.134 -2.775,-2.559 -2.775,-3.575 -2.307,-4.043 v1(-1.793,-4.043)
  Bottom w0.15: U6.9@-3.1,-4.05 -3.093,-4.043 v1@-1.993,-4.043
UART2_RX_MB: CN2.22 RN6.6 | length 2.6
  Bottom w0.15: CN2.22@-9.8,-5.25 -8.6,-5.25 -7.9,-4.55 RN6.6@-7.455,-4.55
UART2_TX: U6.10 U12.86 | length 11.8
  Top w0.15: U12.86@-7.75,1 -7.072,1 -6.892,1.18 -5.03,1.18 -3.895,0.045 -3.895,-1.043 -2.45,-2.488 -2.45,-3.45 -2.25,-3.65 -1.544,-3.65 -1.329,-3.866
  Bottom w0.15: U6.10@-3.1,-4.45 -1.6,-4.45 -1.6,-4.443 v1(-1.207,-4.05)
UART2_TX_MB: CN2.24 RN6.5 | length 2.6
  Bottom w0.15: CN2.24@-9.8,-5.75 -8.65,-5.75 -7.95,-5.05 RN6.5@-7.455,-5.05
UART3_CTS: U6.2 U12.58 | length 12.8
  Top w0.15: v1@-1.195,-0.555 v1(-1.1,-0.555) -0.979,-0.555 -0.848,-0.424 -0.848,4.852 0.735,6.435 1.755,6.435 2.5,7.181 U12.58@2.5,7.75
  Bottom w0.152: U6.2@-3.1,-1.25 -2.517,-1.25 -1.823,-0.555 v1(-1.1,-0.555)
UART3_CTS_MB: CN2.10 RN5.7 | length 2.9
  Bottom w0.152: CN2.10@-9.8,-2.25 -9.081,-2.25 -7.731,-0.9 RN5.7@-7.455,-0.9
UART3_RTS: U6.1 U12.59 | length 12
  Top w0.15: v1(-1.5,-0.1) -1.25,-0.1 -1.125,0.025 -1.125,5.025 0.55,6.7 1.62,6.7 2,7.08 U12.59@2,7.75
  Bottom w0.152: U6.1@-3.15,-0.85 -2.578,-0.85 -1.828,-0.1 v1(-1.5,-0.1)
UART3_RTS_MB: CN2.8 RN5.8 | length 2.9
  Bottom w0.15: CN2.8@-9.8,-1.75 -9.746,-1.696 -8.993,-1.696 -7.648,-0.35 RN5.8@-7.455,-0.35
UART3_RX: U6.3 U12.56 | length 14.3
  Top w0.15: v1(-0.7,-1) -0.55,-0.85 -0.55,4.75 0.85,6.15 2.767,6.15 3.5,6.883 U12.56@3.5,7.75
  Bottom w0.15: -2.478,-1.65 -1.828,-1 v1(-0.7,-1)
  Bottom w0.152: U6.3@-3.1,-1.65 -2.478,-1.65
UART3_RX_MB: CN2.12 RN5.6 | length 2.9
  Bottom w0.152: CN2.12@-9.8,-2.75 -9.084,-2.75 -7.736,-1.403 -7.508,-1.403 RN5.6@-7.455,-1.35
UART3_TX: U6.4 U12.55 | length 15.2
  Top w0.15: v1(-0.2,-1.45) -0.225,-1.425 -0.225,4.575 1.085,5.885 2.95,5.885 4,6.935 U12.55@4,7.75
  Bottom w0.152: U6.4@-3.1,-2.05 -2.383,-2.05 -1.783,-1.45 v1(-0.2,-1.45)
UART3_TX_MB: CN2.14 RN5.5 | length 2.9
  Bottom w0.15: CN2.14@-9.8,-3.25 -9.131,-3.25 -7.756,-1.875 RN5.5@-7.455,-1.875
UART4_RX: U5.1 U12.24 | length 11.4
  Top w0.15: U12.24@5.5,-7.75 v1(5.5,-6.4)
  L4 w0.15: v1(-2.65,-8.75) -2.53,-8.75 -1.88,-8.1 2.9,-8.1 4.8,-6.2 5.3,-6.2 v1@5.425,-6.325
  Bottom w0.15: U5.1@-3.15,-9.3 -3.15,-9.083 -2.817,-8.75 v1(-2.65,-8.75)
UART4_RX_MB: CN2.34 RN3.8 | length 2.6
  Bottom w0.15: CN2.34@-9.8,-8.25 -8.9,-8.25 -8.404,-8.746 RN3.8@-7.455,-8.746
UART4_TX: U5.2 U12.23 | length 10.6
  Top w0.15: U12.23@5,-7.75 v1(5,-6.7)
  L4 w0.15: v1(-2.15,-9.1) -2.15,-8.973 -1.577,-8.4 3.1,-8.4 4.8,-6.7 v1(5,-6.7)
  Bottom w0.15: U5.2@-3.1,-9.7 -2.45,-9.7 -2.15,-9.4 v1(-2.15,-9.1)
UART4_TX_MB: CN2.36 RN3.7 | length 2.6
  Bottom w0.15: CN2.36@-9.8,-8.75 -8.9,-8.75 -8.4,-9.25 RN3.7@-7.455,-9.25
UART7_RX: U4.1 U12.38 | length 5.6
  Top w0.15: U12.38@7.75,0 7.795,0.045 7.84,0 v1(9,0)
  Bottom w0.15: v1(9,0) 9,0.134 10.4,1.534 U4.1@10.4,3.75
UART7_RX_MB: CN2.29 CN4.3 RN1.8 | length 45.7
  Top w0.15: CN4.3@-10.05,0.5 -9.7,0.5 -9.6,0.4 v1@-8.913,0.4
  L3 w0.15: v1(-12.2,-7.25) -10.938,-5.988 -10.938,-1.838 v1(-8.8,0.3) v1@-8.9,0.4 ; v1(-3.9,3.987) -3.9,4.555 0.994,9.449 4.349,9.449 5,10.1 11.35,10.1 v1@13,11.75
  Bottom w0.15: CN2.29@-13.6,-7.25 v1(-12.2,-7.25) ; v1(-8.8,0.3) -7.842,1.258 -4.712,1.258 -4.225,1.745 -4.225,3.662 v1(-3.9,3.987) ; RN1.8@10.945,7.955 10.945,8.4 11.14,8.595 12.7,8.595 13.464,9.359 13.464,10.265 12.9,10.829 12.9,11.65 v1@13,11.75
  other v1: 12.9,11.75
UART7_TX: U4.2 U12.39 | length 4.9
  Top w0.15: U12.39@7.75,0.5 v1(8.75,0.5)
  Bottom w0.15: v1(8.75,0.5) 8.95,0.5 10.125,1.675 10.125,2.95 10,3.075 U4.2@10,3.7
UART7_TX_MB: CN2.31 CN4.2 RN1.7 | length 46.8
  Top w0.15: CN4.2@-10.05,1.5 -9.828,1.278 -9.178,1.278 v1(-8.8,0.9)
  L3 w0.15: v1(-12.494,-7.75) -12.102,-7.75 -10.6,-6.248 -10.6,-2.155 -8.4,0.045 -8.4,0.5 v1(-8.8,0.9) ; v1(-4.522,4.149) -4.522,4.353 -4.4,4.475 -4.395,4.475 -4.175,4.695 -4.175,4.705 0.82,9.7 3.748,9.7
  L3 w0.152: 3.748,9.7 4.117,9.7 4.817,10.4 11.05,10.4 v1@12.4,11.75
  Bottom w0.15: CN2.31@-13.6,-7.75 v1(-12.494,-7.75) ; v1(-8.8,0.9) -8.15,1.55 -4.85,1.55 -4.516,1.884 -4.516,4.143 v1(-4.522,4.149)
  Bottom w0.152: RN1.7@10.445,7.955 10.445,8.495 10.85,8.9 12.575,8.9 13.15,9.475 13.15,10.15 12.622,10.678 12.622,11.448 12.36,11.71 v1@12.4,11.75
  other v1: 12.3,11.75
UART8_RX: U5.3 U12.97 | length 9.8
  Top w0.15: U12.97@-7.75,-4.5 -5.4,-4.5 v1@-3.9,-6
  L3 w0.15: v1@-4,-10.1 -4.291,-9.809 -4.291,-6.391 v1(-3.95,-6.05) v1@-3.9,-6
  Bottom w0.15: v1@-4,-10.1 U5.3@-3.175,-10.1 -3.141,-10.1 -3.12,-10.08 U5.3@-3.1,-10.1
  other v1: -4,-10.025
UART8_RX_MB: CN2.38 RN3.6 | length 2.6
  Bottom w0.15: CN2.38@-9.8,-9.25 -8.9,-9.25 -8.4,-9.75 RN3.6@-7.455,-9.75
UART8_TX: U5.4 U12.98 | length 9.7
  Top w0.15: U12.98@-7.75,-5 -5.321,-5 -4.516,-5.805 v1@-4.516,-6
  L3 w0.15: v1@-4.516,-6 v1(-4.516,-6.05) -4.63,-6.164 -4.63,-9.97 -4,-10.6 v1@-4,-10.7
  Bottom w0.15: v1@-4,-10.6 -3.9,-10.5 U5.4@-3.175,-10.5 U5.4@-3.1,-10.5
  other v1: -4,-10.575
UART8_TX_MB: CN2.40 RN3.5 | length 2.6
  Bottom w0.15: CN2.40@-9.8,-9.75 -8.85,-9.75 -8.355,-10.245 RN3.5@-7.455,-10.245
USB_N: CN1.47 U12.70 | length 8.6
  Top w0.1: U12.70@-3.5,7.75 -3.5,8.232 -3.625,8.357 -3.625,9.3 -2.575,10.35 -1.306,10.35 0.499,12.156 0.706,12.156 v1(0.75,12.2)
  Bottom w0.1: v1(0.75,12.2) CN1.47@0.75,13.6
USB_P: CN1.49 U12.71 | length 8.4
  Top w0.1: U12.71@-4,7.75 -4,8.232 -3.875,8.357 -3.875,9.404 -2.679,10.6 -1.41,10.6 0.223,12.232 0.223,12.473 v1(0.25,12.5)
  Bottom w0.1: v1(0.25,12.5) CN1.49@0.25,13.6
USB_VBUS: CN1.43 R24.1 U12.68 | length 18
  Top w0.15: v1(-2.65,1.684) -2.5,1.834 U12.68@-2.5,7.75 -2.5,8.462 -2.175,8.787 v1(-2.175,9.3)
  Bottom w0.15: v1(-2.65,1.684) -1.799,0.833 -0.402,0.833 -0.068,0.5 R24.1@0.65,0.5 ; v1(-2.175,9.3) 0.023,11.498 0.861,11.498 1.75,12.386 CN1.43@1.75,13.6
USB_VBUS_SENSE: R24.2 U12.15 | length 12.9
  Top w0.15: U12.15@1,-7.75 1,-6.549 3.57,-3.98 3.998,-3.98 4.349,-3.628 4.349,-0.849 v1(2.2,1.3)
  Bottom w0.15: R24.2@1.55,0.5 1.552,0.502 2.002,0.502 2.2,0.7 v1(2.2,1.3)
VCAP1: C43.1 U12.49 | length 4.5
  Top w0.15: U12.49@7.75,5.5 8.65,5.5 9.495,4.655 9.995,4.655 v1(10,4.65)
  Bottom w0.15: v1@10.15,4.55 10.437,4.55 11.488,5.6 C43.1@11.6,5.6
VCAP2: C42.1 U12.73 | length 1.9
  Top w0.2: U12.73@-5,7.75 C42.1@-5,9.65
VCC3: C2.2 C5.2 C6.1 C9.2 C10.2 C11.2 C12.2 C13.2 C14.2 C15.1 C16.2 C22.2 C28.1 C29.1 C30.1 C31.1 C32.1 C33.1 C34.1 C35.1 CN2.2 CN2.4 CN4.1 D1.2 L1.2 R2.1 R5.1 R6.2 R19.2 U3.3 U3.7 U3.8 U4.5 U4.6 U4.16 U5.5 U5.6 U5.16 U6.5 U6.6 U6.16 U7.1 U7.5 U7.8 U11.5 U12.11 U12.19 U12.28 U12.50 U12.75 U12.100 | length 129.1
  Top w0.15: C31.1@8.95,7.05 8.975,7.05 9.6,7.675 9.6,8.548 9.978,8.925 10.16,8.925 U3.8@10.4,9.165 ; U3.8@10.4,9.4 U3.8@10.4,9.165 ; U3.7@11.425,9.39 11.425,9.3 11.3,9.175 10.41,9.175 U3.8@10.4,9.165
  Top w0.2: C30.1@-9.482,-6 U12.100@-7.75,-6 v1(-5.95,-6) ; U12.75@-6,7.75 C34.1@-6,9.652 ; C35.1@-2.85,-9.55 -1.95,-9.55 v1(-1.4,-9) -1,-8.6 U12.11@-1,-7.75 ; C33.1@3,-10.45 3.025,-10.45 3,-10.425 v1(3,-9.4) U12.19@3,-7.75 ; U12.28@7.75,-5 v1(8.975,-5) C32.1@9.6,-5 ; U12.50@7.75,6 8.385,6 v1(8.785,6.4)
  Top w0.3: U3.3@12.375,5.41 12.375,3.723 12.5,3.598 v1(12.5,3.6)
  Top w0.4: CN4.1@-10.05,2.5 -9.1,2.5 -8.787,2.187 -8.8,2.174 -8.787,2.161 v1(-8.787,1.55) ; C28.1@-7.006,9.65 -7.009,9.647 -7.009,8.809 v1(-6.9,8.7) ; C28.1@-7.005,9.651 C34.1@-6.001,9.651 ; C12.2@-4.7,-11.5 C29.1@-3.3,-11.5 -3.3,-11.09 -3.01,-10.8 -3.01,-9.46 C35.1@-3,-9.45 ; v1(8.785,6.4) 8.95,6.565 C31.1@8.95,7.05
  L3 w0.3: v1(-5.95,-6) -5.488,-6 -4.191,-4.704 ; v1(8.785,6.4) 10.36,6.4 12.5,4.26 v1(12.5,3.6)
  L3 w0.4: v1(-5.8,-2.45) -5.8,-3.095 -4.223,-4.673 -4.191,-4.704 v1(-3.15,-5.745) -3.15,-6.7 -1.5,-8.35 -1.45,-8.35 ; v1@-1.402,-9 -1.402,-8.398 -1.45,-8.35 ; v1(1.1,-9.4) 0.05,-8.35 -1.45,-8.35 ; v1@3,-9.388 3.607,-9.388 6.446,-6.549 6.977,-6.549 8.526,-5 8.7,-5 v1(8.975,-5)
  L4 w0.4: v1(-8.787,1.55) -7.6,1.55 ; v1(-5.8,-2.45) -7.6,-0.65 -7.6,1.55 ; v1(1.1,-9.4) v1(3,-9.4) ; v1(8.785,6.4) 7.45,5.065 7.45,3.994 5.347,1.891 -1.741,1.891 -2.099,2.25 -4.634,2.25 -5.334,1.55 -7.6,1.55
  Bottom w0.15: C13.2@-6.55,-11.1 -6.35,-10.9 -4.3,-10.9 -4.1,-11.1 ; R6.2@-6.55,-7.7 -6.538,-7.712 -6.538,-7.812 -6.135,-8.215 -2.185,-8.215 v1(-1.4,-9) ; R5.1@-6.55,-6 v1(-5.95,-6) ; -3.9,-11.3 U5.6@-3.175,-11.3 U5.6@-3.1,-11.3 ; -3.9,-11.098 -3.702,-10.9 U5.5@-3.175,-10.9 U5.5@-3.1,-10.9 ; -3.35,-8.201 U7.5@-3.35,-7.6 ; U6.5@-3.175,-2.45 -3.1,-2.45 U6.6@-3.1,-2.85 ; R19.2@-0.012,-3.488 R19.2@0,-3.5 ; D1.2@0.9,-10.075 0.726,-9.901 0.726,-9.774 v1(1.1,-9.4) ; C10.2@7.75,1.45 7.75,2.05 8.4,2.7 8.4,3.1 ; U4.6@8.4,3.7 8.4,3.1 ; C11.2@8.5,7.05 8.5,6.616 8.8,6.316 U4.16@8.8,5.475 U4.5@8.8,3.825 8.8,3.2 8.7,3.1 8.4,3.1
  Bottom w0.2: C14.2@-6.55,-2.65 -6,-2.65 v1(-5.8,-2.45) ; v1@-5.75,-2.45 U6.16@-4.825,-2.45 U6.5@-3.175,-2.45 ; v1@-4.017,-11.48 v1@-4,-11.498 ; U7.8@-3.35,-6.4 -2.9,-6.4 ; U6.5@-3.1,-2.45 -2.18,-2.45 -1.898,-2.167 -1.35,-2.167 -1.35,-2.613 -0.475,-3.488 -0.012,-3.488 -0.012,-3.118 0.507,-2.6 C22.2@1.2,-2.6 ; -2.9,-5.995 -2.9,-6.4 ; U7.1@-2.45,-6.4 -2.9,-6.4 ; C22.2@1.2,-2.575 1.525,-2.9 2.8,-2.9 2.95,-2.75 U11.5@2.95,-2.45
  Bottom w0.4: C6.1@-7.25,7.918 -7.08,7.918 -6.9,8.098 v1(-6.9,8.7) ; C16.2@-3.8,-5.3 -3.595,-5.3 v1(-3.15,-5.745) -2.9,-5.995
  Bottom w0.5: -9.4,-0.6 -9.4,1.2 -9.05,1.55 v1(-8.787,1.55) -8.65,1.687 C2.2@-8.65,2.367 -8.129,2.367 -7.55,2.946 C5.2@-7.55,3.6 R2.1@-7.55,4.5 -7.55,5.76 -7.25,6.06 -7.25,7.788 C6.1@-7.38,7.918 ; C6.1@-7.42,7.918 C6.1@-7.38,7.918 ; C6.1@-7.25,7.918 C6.1@-7.38,7.918
  Bottom w0.6: L1.2@-8.821,8.3 -8.821,7.918 C6.1@-7.42,7.918
  other v1: -4,-11.5
VCC3_FB: C5.1 R2.2 R4.2 U1.4 | length 3.2
  Bottom w0.152: U1.4@-9.596,6.029 -9.104,6.029 -8.425,5.35 R4.2@-8.4,5.35 -8.425,5.325 -8.425,4.525 R2.2@-8.45,4.5 C5.1@-8.45,3.6
VCC3_SW: L1.1 U1.2
VCC3A: C8.2 C17.2 C21.2 C37.1 C38.2 R20.1 U2.1 U8.6 U10.6 U12.22 | length 21.7
  Top w0.15: U12.22@4.5,-7.75 4.5,-9.645 5.1,-10.245 5.1,-10.27 5.275,-10.445 5.3,-10.445 6.205,-11.35 C37.1@6.4,-11.35 ; U2.1@5.25,-13.275 5.575,-13.275 6.05,-12.8 6.25,-12.8 C8.2@6.4,-12.65 ; v1@8.282,-11.35 8.332,-11.4 8.35,-11.382 v1(8.35,-11.35) ; C17.2@12.25,-6.05 12.328,-5.972 12.772,-5.972 13.152,-6.352 13.41,-6.61 v1(13.41,-6.95) 13.41,-6.99 13.2,-7.2 U8.6@12.485,-7.2
  Top w0.25: C8.2@6.4,-12.65 6.4,-11.35 v1@8.282,-11.35
  L4 w0.15: v1(8.35,-11.35) 8.629,-11.35 10.969,-9.01 12.025,-9.01 v1(12.485,-8.55) 12.485,-7.875 v1(13.41,-6.95)
  Bottom w0.15: C21.2@12.25,-5.95 12.75,-5.95 13.41,-6.61 v1(13.41,-6.95) ; v1(12.485,-8.55) U10.6@12.485,-8
VCC5: C1.2 C3.1 C4.2 C7.1 C18.2 C19.2 C20.2 C23.2 CN2.1 CN2.3 CN2.5 CN2.7 CN3.1 CN3.3 CN3.5 R1.1 R21.2 R23.2 U1.5 U1.7 U1.8 U2.3 U2.4 U9.3 U9.7 | length 70.5
  Top w0.1: R23.2@-13.4,6.15 R1.1@-12.5,5.25 R1.1@-12.491,5.241 ; R1.1@-12.509,5.241 R1.1@-12.5,5.241
  Top w0.15: C7.1@2.7,-13.2 2.95,-12.95 3.5,-12.95 3.825,-12.625 U2.3@4.25,-12.625 ; v1@3.7,-13.1 3.875,-13.275 U2.4@4.25,-13.275
  Top w0.152: R1.1@-12.605,5.245 -12.601,5.241 R1.1@-12.509,5.241 ; R1.1@-12.5,5.241 -12.491,5.241 -12.132,4.882 -11.899,4.882 v1(-11.85,4.833)
  Top w0.4: v1(10.805,2.292) 11.162,2.292 11.348,2.107 11.348,1.1
  L3 w0.152: v1(-11.85,4.833) -11.15,4.133 v1(-11.15,3.35) -10.65,2.85 -10.05,2.85 v1(-9.55,3.35) ; 1.1,-7.8 1.25,-7.8 1.882,-7.168 1.882,-6.302 2.534,-5.65 v1(3.75,-5.65)
  L3 w0.4: v1(0.55,2.4) 0.55,1.9 ; v1(3.15,2.4) 3.163,2.388 3.163,1.9 ; v1(3.6,-12.95) 3.15,-12.95 2.45,-12.25 2.45,-9.15 1.1,-7.8 -1.163,-7.8 -2.55,-6.413 -2.55,-4.094 -3.744,-2.9 -4.546,-2.9 -6.116,-1.329 -6.116,2.234 -6.1,2.25 v1(-5.9,2.25) -2.016,2.25 -1.666,1.9 0.55,1.9 ; v1(10.805,2.292) 9.698,3.4 7.23,3.4 5.73,1.9 3.163,1.9 ; 0.55,1.9 3.163,1.9
  L4 w0.4: v1(-13.78,1.57) -10.28,1.57 -9.6,2.25 v1(-5.9,2.25)
  Bottom w0.1: v1(3.15,2.4) v1@3.15,2.5
  Bottom w0.15: v1(3.15,2.4) 3.15,2 C19.2@3.35,1.8 ; v1@3.15,2.5 U9.3@3.15,3.18 U9.3@3.15,3.23 ; v1(3.75,-5.65) 4.1,-5.3 R21.2@4.75,-5.3
  Bottom w0.152: v1@-9.65,3.517 U1.5@-9.65,4.05
  Bottom w0.2: C18.2@-0.532,1.75 C18.2@-0.382,1.75 ; v1(0.55,2.4) v1@0.55,2.45
  Bottom w0.25: U9.7@0.55,3.23 U9.7@0.55,3.18 v1(0.55,2.4) 0.7,2.25 C20.2@0.7,1.85
  Bottom w0.3: v1@-5.9,2.257 -5.793,2.15 C4.2@-5.1,2.15
  Bottom w0.4: C18.2@-0.382,1.75 C20.2@0.7,1.75 ; v1(10.805,2.292) 10.993,2.48 11.75,2.48 C23.2@11.75,2.505
VCC5_SENSE: C39.2 R21.1 R22.2 U12.29 | length 4
  Top w0.15: v1(6.65,-4.6) 6.75,-4.5 U12.29@7.75,-4.5
  Bottom w0.15: R21.1@5.65,-5.3 R22.2@5.65,-4.4 ; C39.2@5.65,-3.5 R22.2@5.65,-4.4 ; v1(6.65,-4.6) 6.45,-4.4 R22.2@5.65,-4.4
VCC5_SENSE_B: R23.1 R25.2 U12.91 | length 11.5
  Top w0.1: R25.2@-14.3,5.25 R23.1@-13.4,5.25 -13.375,5.25 -12.1,3.975 -12.1,1.8 -11.2,0.9 -11.2,0.3 -10.9,0 -9.106,0 -8.8,-0.306 -8.8,-1.2 -8.5,-1.5 U12.91@-7.75,-1.5
pads on no net: CN1.H1 CN1.H2 CN2.6 CN2.9 CN2.39 CN2.H1 CN2.H2 U8.3 U10.3
copper on no net: | length 0.3
  Bottom w0.2: 11.115,-7.2 11.375,-7.2

## Polygon pours and split planes (outlines as drawn)
GND on GND2 "GND_L02_P008" (solid, remove dead copper, pour order 8): -15,-12.5 ccw(c-12.5,-12.5) -12.5,-15 12.5,-15 ccw(c12.5,-12.5) 15,-12.5 15,12.5 ccw(c12.5,12.5) 12.5,15 -12.5,15 ccw(c-12.5,12.5) -15,12.5
GND on L3 "GND_L03_P009" (solid, remove dead copper, pour order 9): -15,-12.5 ccw(c-12.5,-12.5) -12.5,-15 12.5,-15 ccw(c12.5,-12.5) 15,-12.5 15,12.5 ccw(c12.5,12.5) 12.5,15 -12.5,15 ccw(c-12.5,12.5) -15,12.5
GND on GND5 "GND_L05_P011" (solid, remove dead copper, pour order 11): -15,-12.5 ccw(c-12.5,-12.5) -12.5,-15 12.5,-15 ccw(c12.5,-12.5) 15,-12.5 15,12.5 ccw(c12.5,12.5) 12.5,15 -12.5,15 ccw(c-12.5,12.5) -15,12.5
GND on Bottom "GND_L06_P012" (solid, remove dead copper, pour order 19): -15,-12.5 ccw(c-12.5,-12.5) -12.5,-15 12.5,-15 ccw(c12.5,-12.5) 15,-12.5 15,12.5 ccw(c12.5,12.5) 12.5,15 -12.5,15 ccw(c-12.5,12.5) -15,12.5
VCC3 on Bottom "VCC3_L06_P021" (solid, pour order 21): -2.7,-6 -2.7,-6.4 -3.1,-6.4 -3.1,-6
VCC3 on Bottom "VCC3_L06_P013" (solid, pour order 13): -3.799,-11.599 -3.9,-11.701 -4.1,-11.701 -4.2,-11.601 -4.2,-11 -3.801,-11
VCC5 on Bottom "VCC5_L06_P015" (solid, pour order 15): -14.1,-0.6 -14.4,-0.6 -14.45,-0.55 -14.45,-0.45 -14.4,-0.4 -14.1,-0.4 -14.1,-0.1 -14.15,-0.05 -14.15,0.05 -13.3,0.9 -13.3,2.9 -13.1,3.1 -10.7,3.1 -10.525,3.275 -10.525,3.95 -10.775,3.95 -10.775,3.675 -10.85,3.6 -10.95,3.6 -11.025,3.675 -11.025,4.025 -11.275,4.025 -11.275,3.699 -11.374,3.6 -11.9,3.6 -12.2,3.9 -12.2,4.5 -12.3,4.6 -14.9,4.6 -15,4.5 -15,-1.8 -14.9,-1.9 -14.1,-1.9 -14.1,-1.6 -14.4,-1.6 -14.45,-1.55 -14.45,-1.45 -14.4,-1.4 -14.1,-1.4 -14.1,-1.101 -14.1,-1.1 -14.4,-1.1 -14.45,-1.05 -14.45,-0.95 -14.4,-0.9 -14.1,-0.9
VCC3_SW on Bottom "VCC3_SW_L06_P017" (solid, pour order 17): -10.775,6.2 -10.775,7.125 -10.999,7.349 -10.999,8.03 -10.425,8.03 -10.425,7.376 -10.525,7.276 -10.525,6.2
GND on L4 "GND_L04_P010" (solid, remove dead copper, pour order 10): -15,-12.5 ccw(c-12.5,-12.5) -12.5,-15 12.5,-15 ccw(c12.5,-12.5) 15,-12.5 15,12.5 ccw(c12.5,12.5) 12.5,15 -12.5,15 ccw(c-12.5,12.5) -15,12.5
GND on Top "GND_L01_P007" (solid, remove dead copper, pour order 7): -15,-12.5 ccw(c-12.5,-12.5) -12.5,-15 12.5,-15 ccw(c12.5,-12.5) 15,-12.5 15,12.5 ccw(c12.5,12.5) 12.5,15 -12.5,15 ccw(c-12.5,12.5) -15,12.5

## Other copper
Bottom:
  pour cut-out: -12.8,-2.6 -12.2,-2.6 -12.1,-2.7 -12.1,-4.3 -12.2,-4.4 -12.8,-4.4 -12.8,-12.5 -10.8,-12.5 -10.8,0 -12.8,0

## Silkscreen, mask and mechanical layers (free items; w line width, h text height)
Top Overlay:
  region: -3.707,-13.668 -4.003,-14.838 -4.628,-14.838 -4.346,-13.71 -4.346,-13.619 ccw(c-4.422,-13.619) -4.422,-13.543 -4.499,-13.543 ccw(c-4.499,-13.725) -4.628,-13.596 -4.648,-13.616 ccw(c-4.531,-13.733) -4.684,-13.67 -4.979,-14.838 -5.603,-14.838 -5.192,-13.169 -4.559,-13.169 -4.598,-13.36 -4.532,-13.295 cw(c-4.119,-13.708) -4.119,-13.124 -3.946,-13.124 cw(c-3.946,-13.41) -3.744,-13.208 -3.72,-13.232 cw(c-3.862,-13.375) -3.66,-13.375 -3.653,-13.375 -3.58,-13.302 cw(c-3.149,-13.733) -3.149,-13.124 -3.02,-13.124 -3.013,-13.124 cw(c-3.013,-13.451) -2.685,-13.451 -2.959,-14.579 -2.99,-14.64 -3.058,-14.724 -3.134,-14.777 -3.218,-14.815 -3.31,-14.838 -3.653,-14.838 -3.363,-13.688 -3.363,-13.627 ccw(c-3.447,-13.627) -3.447,-13.543 -3.523,-13.543 ccw(c-3.523,-13.708) -3.64,-13.591 -3.687,-13.638 ccw(c-3.622,-13.703) hole: -4.598,-13.36 -4.605,-13.36 -4.605,-13.368 -4.598,-13.368
  region: 11 vertices and 1 holes, not listed, extent -12.659,-14.838 -10.549,-12.644
  region: -6.435,-14.382 ccw(c-6.474,-14.343) -6.419,-14.343 -6.114,-13.169 -5.489,-13.169 -5.901,-14.838 -6.525,-14.838 -6.487,-14.655 -6.495,-14.655 -6.575,-14.735 cw(c-6.916,-14.394) -6.916,-14.876 -7.145,-14.876 cw(c-7.145,-14.597) -7.425,-14.597 -7.425,-14.541 -7.089,-13.169 -6.464,-13.169 -6.746,-14.305 -6.746,-14.381 ccw(c-6.663,-14.381) -6.663,-14.465 -6.571,-14.465 ccw(c-6.571,-14.336) -6.48,-14.427
  region: -8.621,-14.838 -9.253,-14.838 cw(c-9.203,-14.611) -9.436,-14.606 -9.436,-14.541 -8.964,-12.659 -8.339,-12.659 -8.468,-13.169 -8.209,-13.169 -8.301,-13.55 -8.56,-13.55 -8.766,-14.351 -8.766,-14.377 ccw(c-8.678,-14.377) -8.678,-14.465 -8.528,-14.465
  region: -9.246,-12.644 -9.802,-14.838 -10.427,-14.838 -9.878,-12.644
  region: -7.364,-13.169 -7.775,-14.838 -8.408,-14.838 -7.988,-13.169
  region: -2.235,-14.564 -2.289,-14.838 -2.372,-14.838 -2.426,-14.564 -2.433,-14.564 -2.433,-14.838 -2.502,-14.838 -2.502,-14.488 -2.38,-14.488 -2.331,-14.724 -2.281,-14.488 -2.159,-14.488 -2.159,-14.838 -2.228,-14.838 -2.228,-14.564
  region: -2.54,-14.549 -2.647,-14.549 -2.647,-14.838 -2.715,-14.838 -2.715,-14.549 -2.822,-14.549 -2.822,-14.488 -2.54,-14.488
  region: 14,3.5 15,2.5 15,3.5
  lines w0.15: 8.8,-3 9.6,-3 cw(c9.6,-3.5) 9.901,-3.101 ; 8.8,3 9.6,3 ccw(c9.6,3.5) 9.901,3.101 10.165,3.365 10.165,3.372 cw(c10.5,3) 10.5,3.5 14,3.5 ; 9.9,-3.1 9.9,-3.106 10.165,-3.372 ccw(c10.5,-3) 10.5,-3.5 14,-3.5 ccw(c14,-2.5) 15,-2.5 15,2.5 ; 14,3.5 15,3.5 15,2.5 ; 14,3.5 15,2.5
  text "KAME FMU rev.2 2019" at 0.85,13.05 h1.5
  text "IMU" at 11.5,-4.9 h1.5
  text "DEBUG" at -14.525,-5.9 h1.5
  text "Altium Advanced Training: '.Pcb_File_Name_No_Path'" at -17.8,-18.467 h1
Bottom Overlay:
  region: 12.5,10.9 12.5,12.7 0,12.7 0,10.9
  rectangle: -12.7,-12.5 -10.9,0
  text "FMU_A" at -1.6,6.2 h1.5 r270
  text "FMU_B" at -6.2,0.4 h1.5
Private notes:
  text "627920-547375727520-526F626F74696373" at -12.6,-16.6 h1.2
Board:
  the board outline again, w0.1